# Altium PCB PiggySat-board.PcbDoc
Units mil, origin at the board's own origin, x right, y up, seen from the top; angles counter-clockwise.
Board outline 1968.5 x 1968.5 mil, 4 copper layers (Top Layer, Mid Layer 1, Mid Layer 2, Bottom Layer), stack 62.45 mil thick; 45 components, 33 nets, 206 pads, 454 vias.
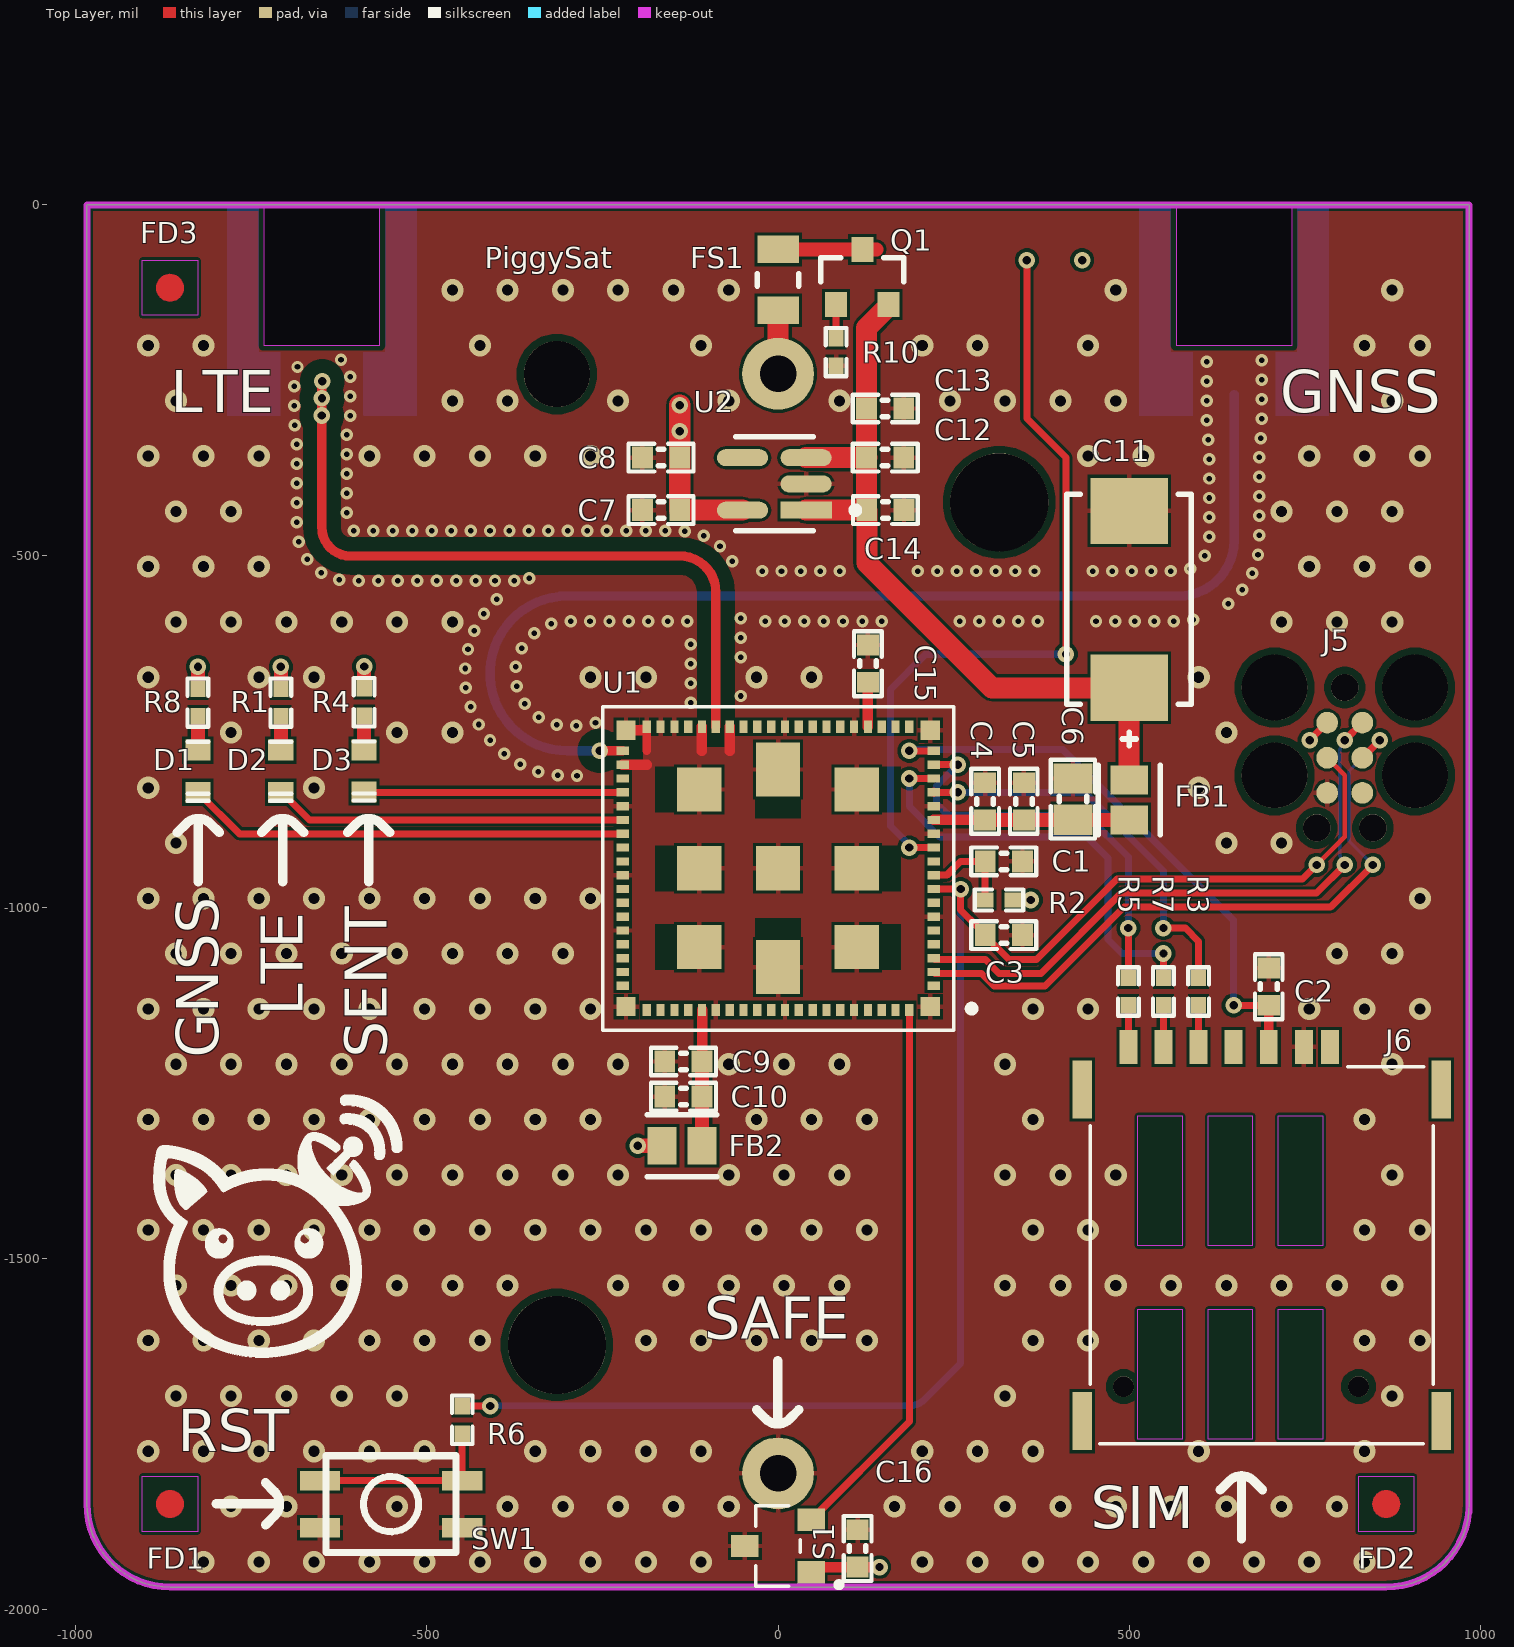
[diagram p0: Top Layer view]
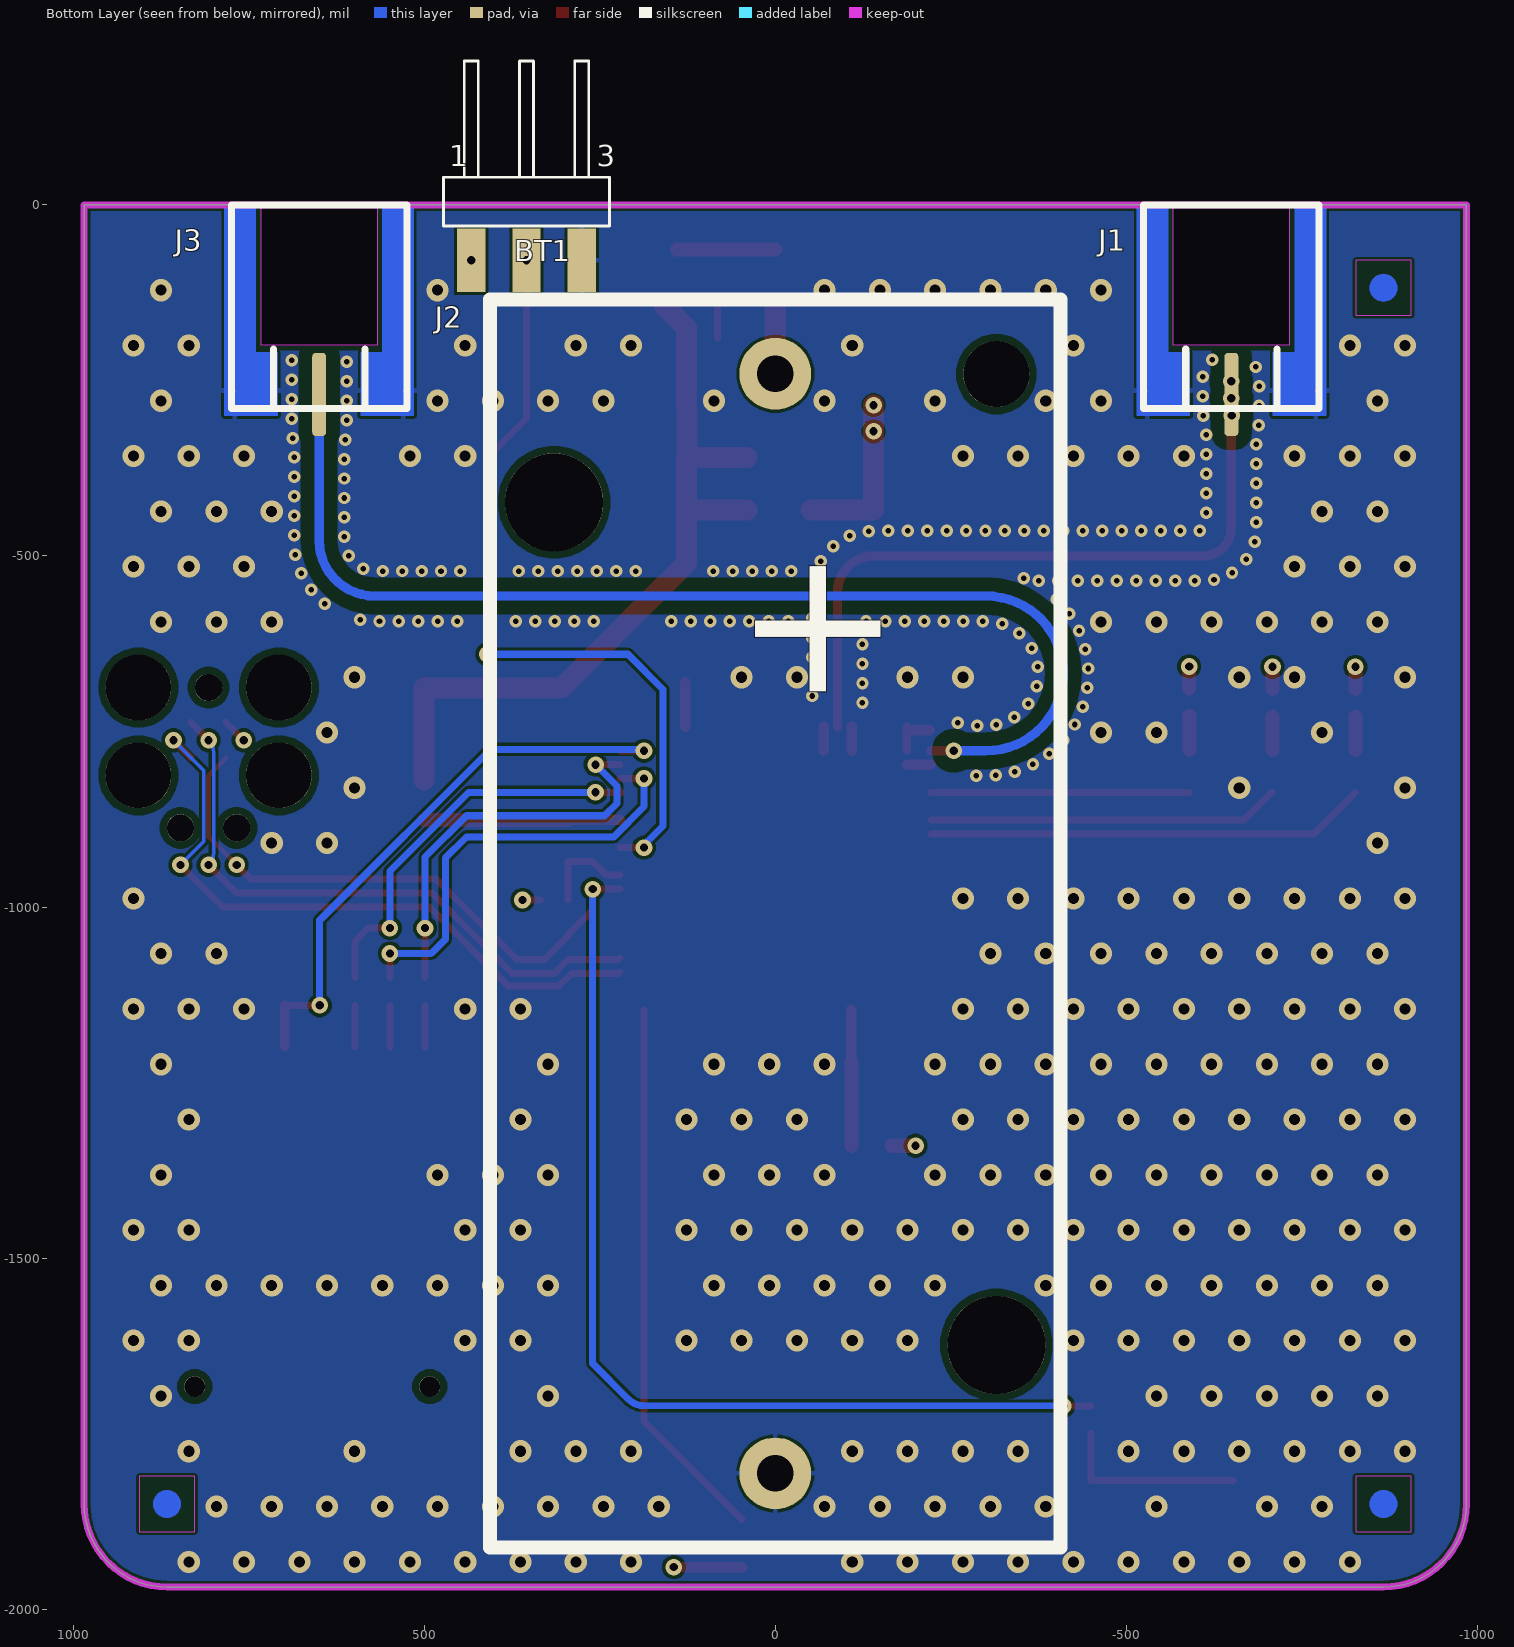
[diagram p1: Bottom Layer view, seen from below]
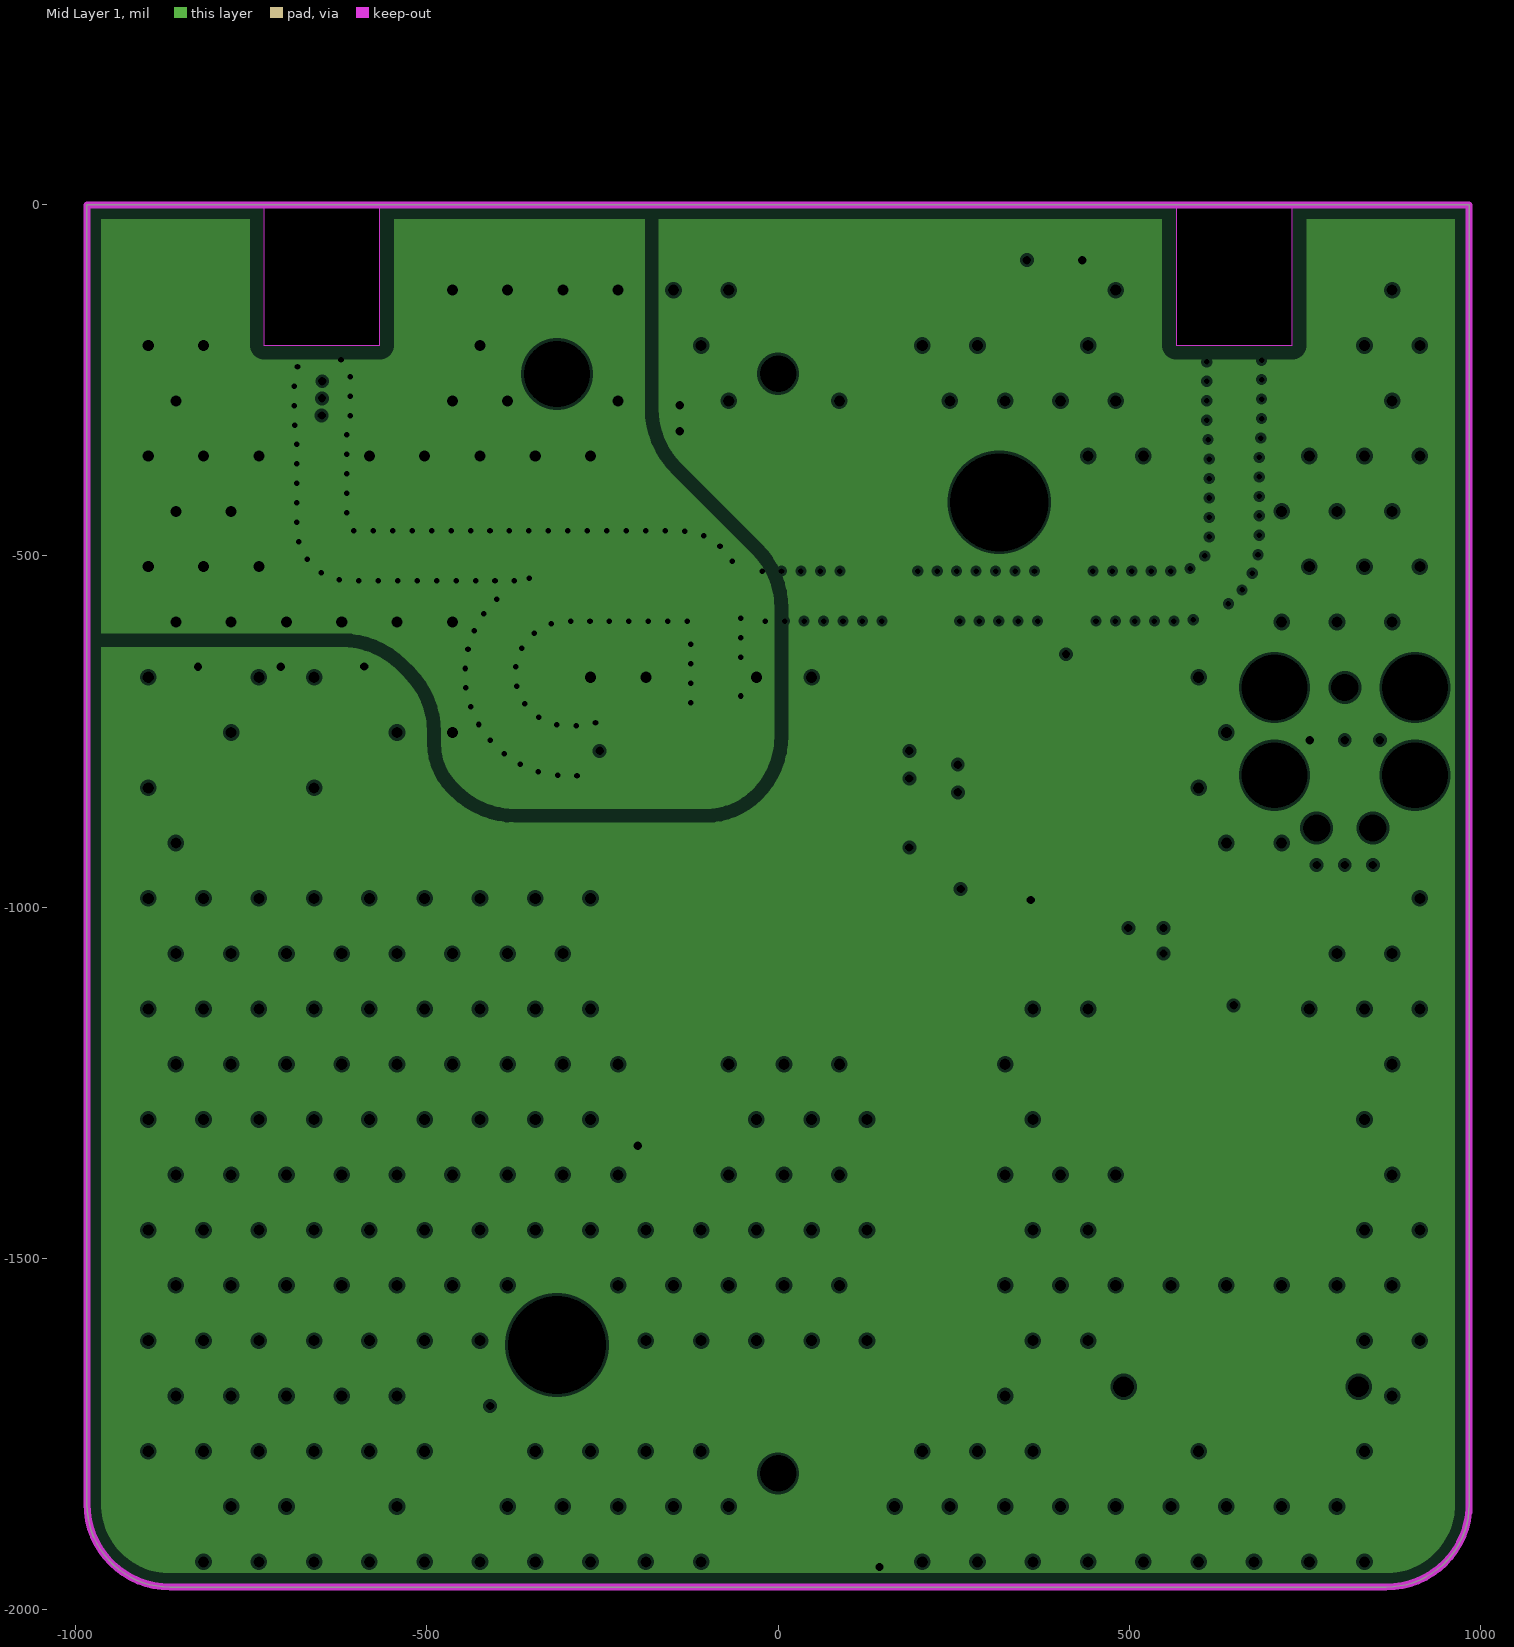
[diagram p2: Mid Layer 1, clearances drawn from the general rule]
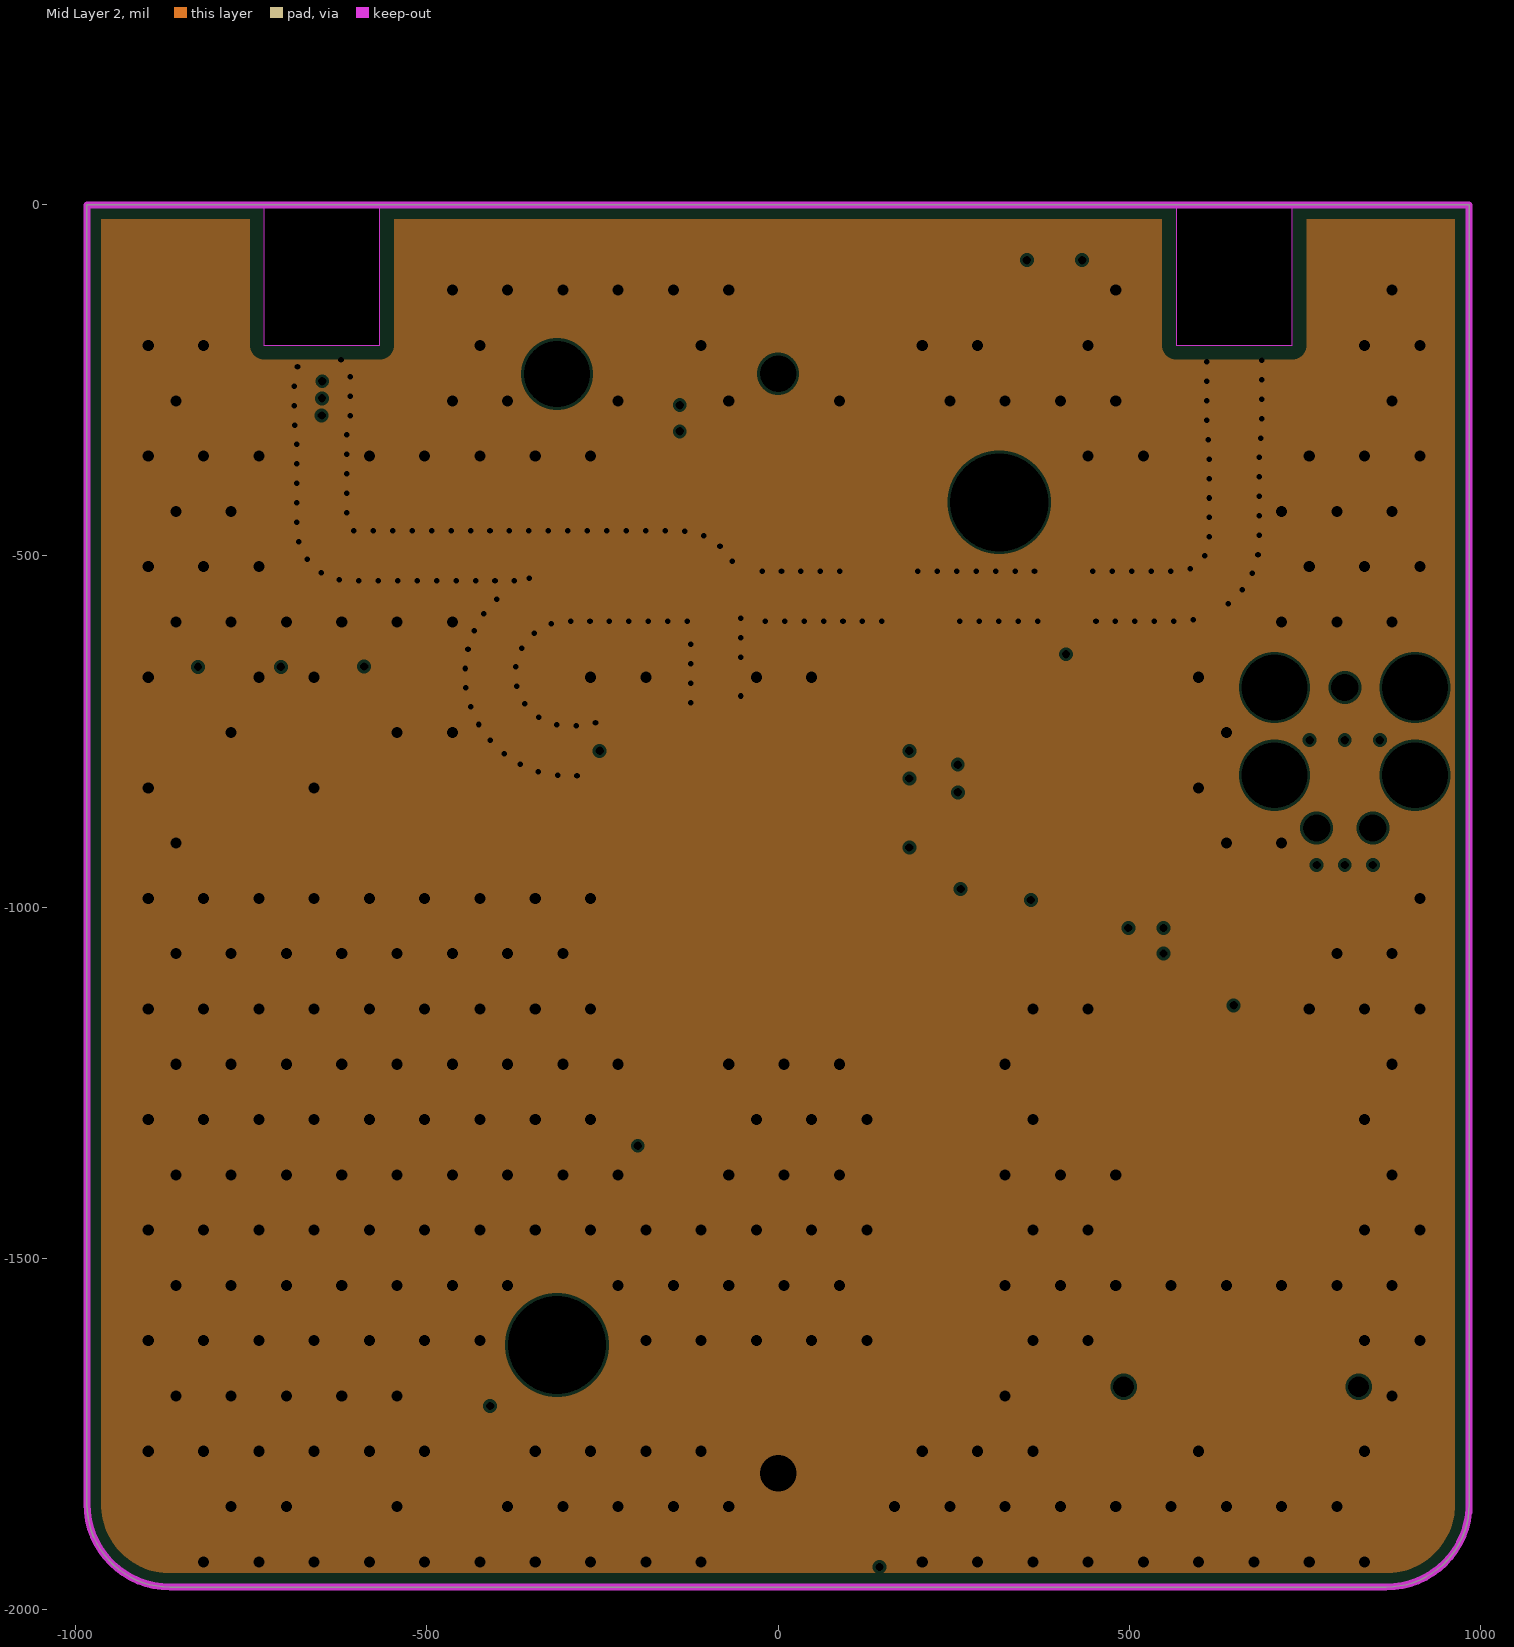
[diagram p3: Mid Layer 2, clearances drawn from the general rule]
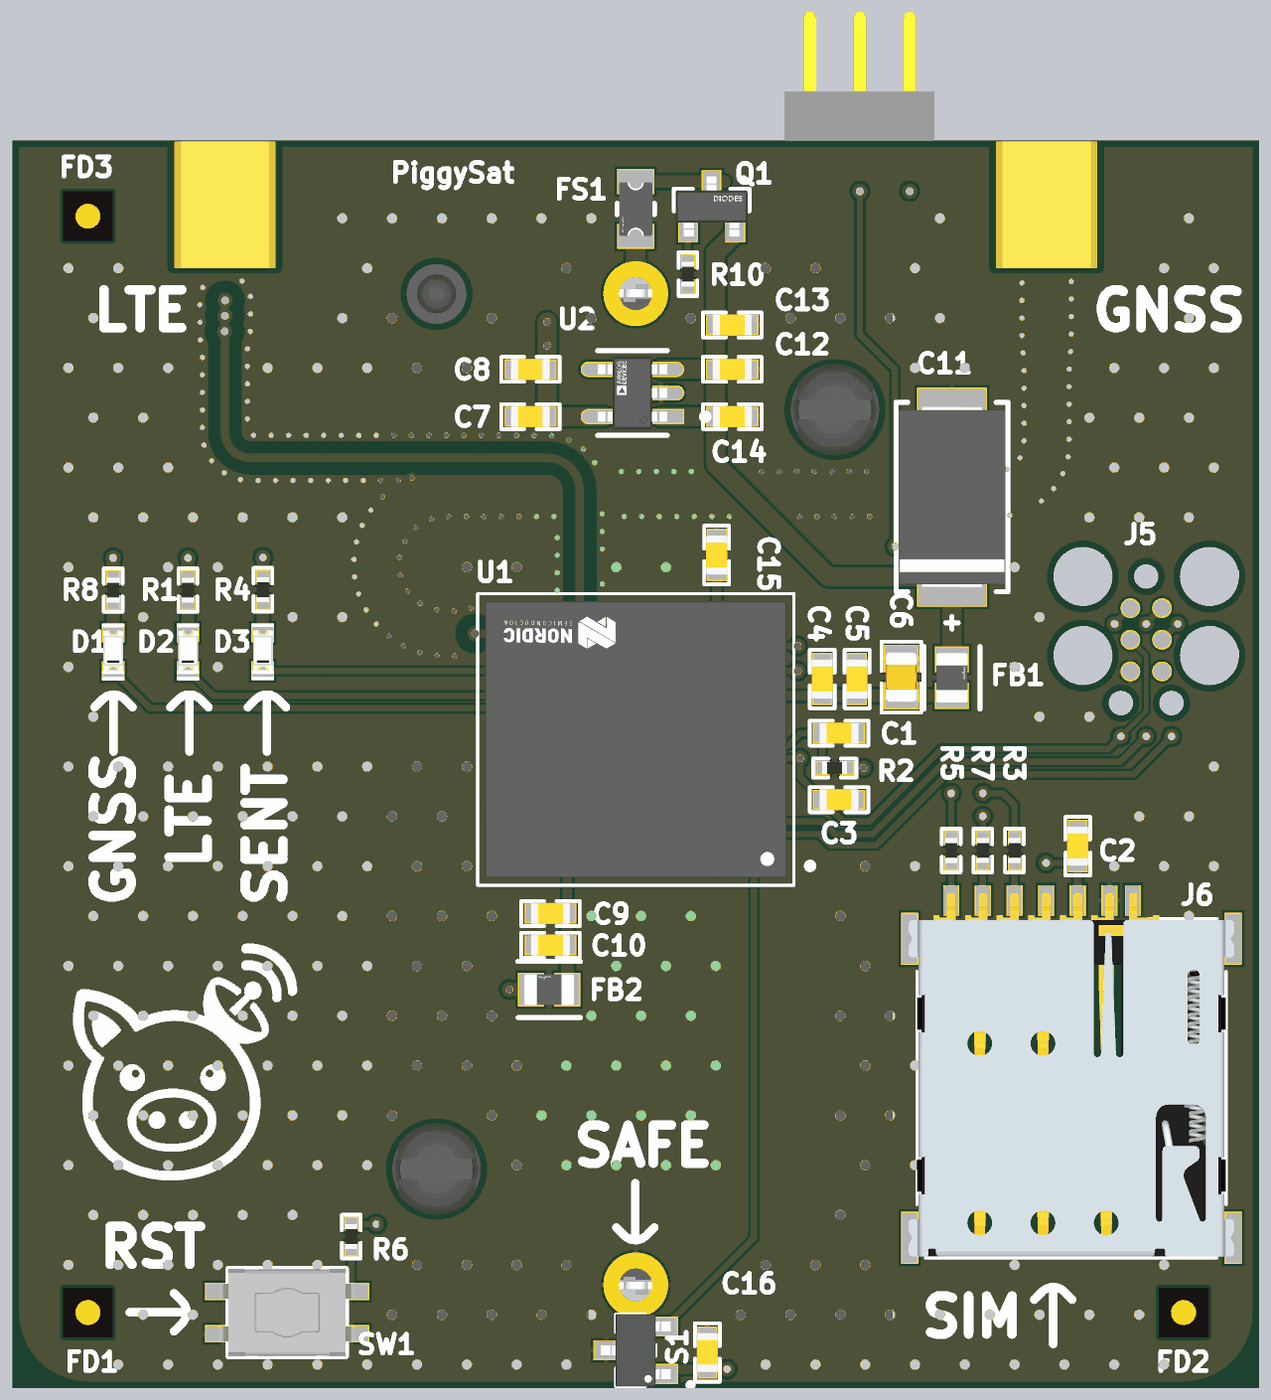
[diagram p4: 3D render of the assembled board from above, using the file's embedded part models]
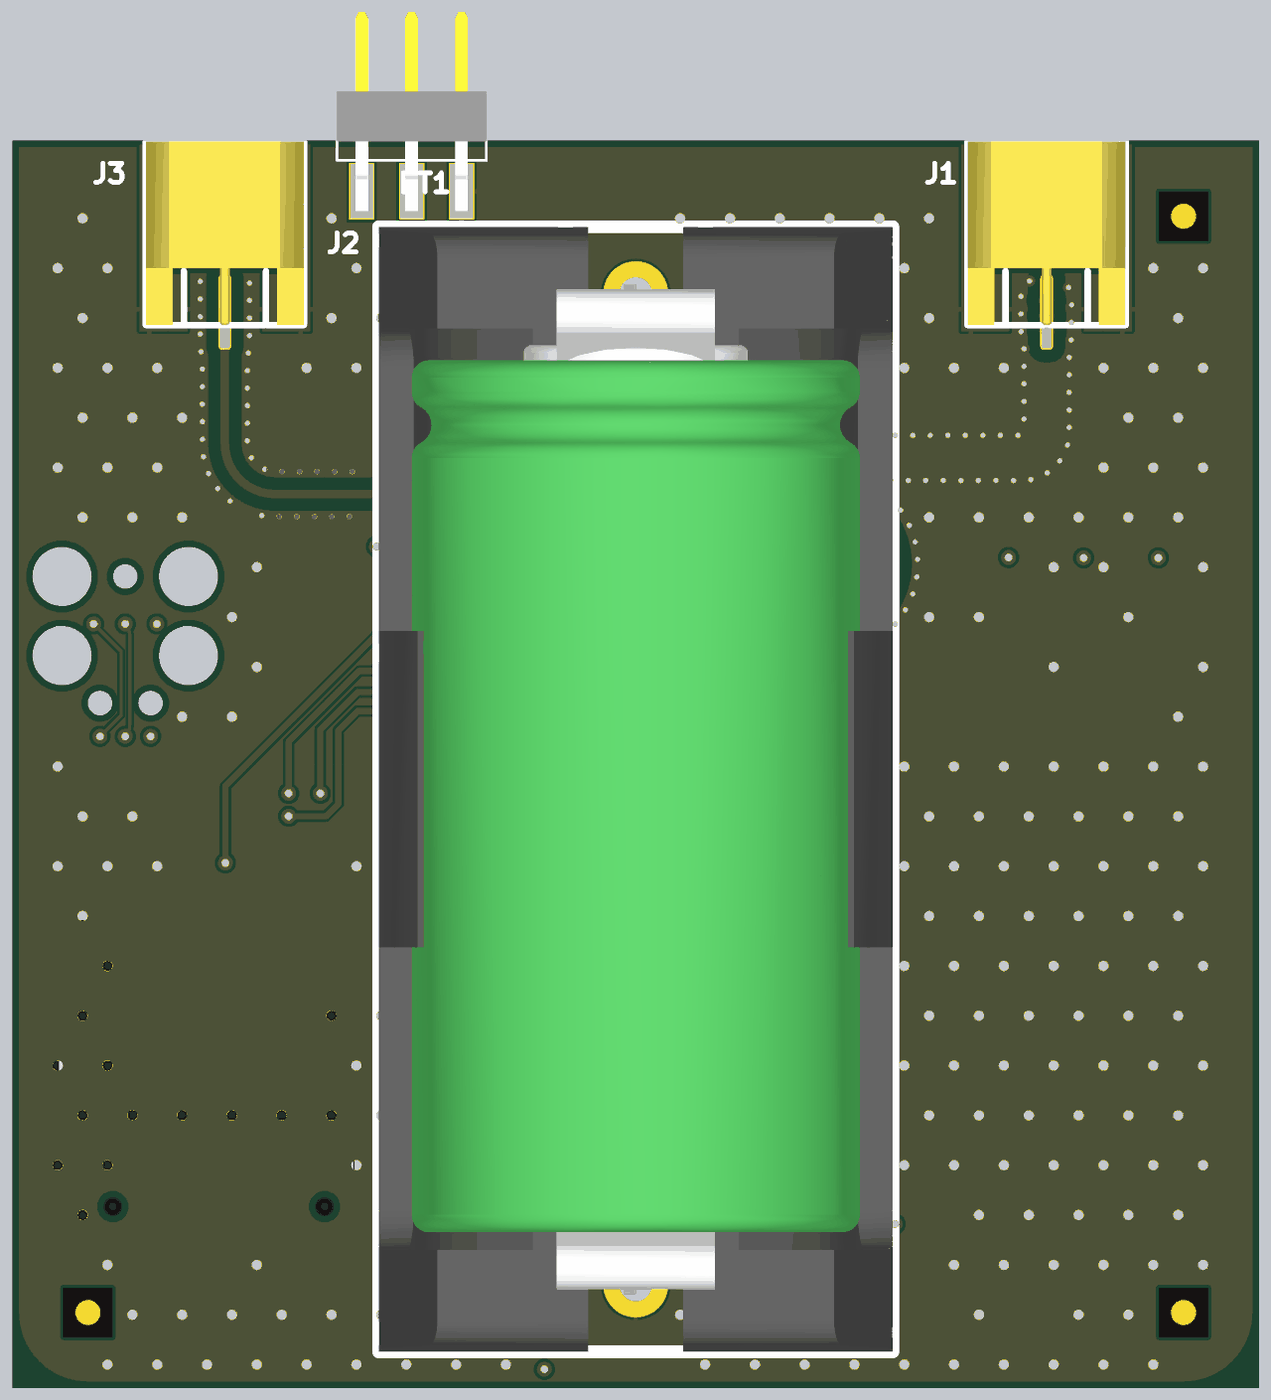
[diagram p5: 3D render of the assembled board from below, using the file's embedded part models]

## Layer stack, top to bottom
Top Solder: solder mask 0.5, Solder Resist, Dk 3.8
Top Layer: signal copper 1.3799
Dielectric 1: prepreg 8.2799, 7628, Dk 4.4
Mid Layer 1: plane copper 0.6, net (Multiple Nets)
Core: core 41.9299, FR-4, Dk 4.6
Mid Layer 2: plane copper 0.6, net GND
Dielectric 2: prepreg 8.2799, 7628, Dk 4.4
Bottom Layer: signal copper 1.3799
Bottom Solder: solder mask 0.5, Solder Resist, Dk 3.8

## Board outline
-866.14,-1968.5 cw(c-866.14,-1850.39) -984.25,-1850.39 -984.25,0 984.25,0 984.25,-1850.39 cw(c866.14,-1850.39) 866.14,-1968.5

## Design rules (kind name [scope] priority, off if disabled: settings)
BoardOutlineClearance [All] p1: gap=7.87 ignorepadtopadclearanceinfootprint=FALSE
Clearance Clearance_RF [InPoly vs InNetClass('RF')] p1: gap=19.68 ignorepadtopadclearanceinfootprint=FALSE
Clearance [All] p2: gap=4 ignorepadtopadclearanceinfootprint=FALSE except(5: Arc-Via Track-Via SMDPad-Via THPad-Via Via-Via Via-Fill Via-Poly Via-Region Via-Text; 9.84: Arc-Hole Track-Hole SMDPad-Hole THPad-Hole Via-Hole Fill-Hole Poly-Hole Region-Hole Text-Hole)
ComponentClearance [All] p1: gap=4 collisioncheckmode=3 verticalgap=4 showdistances=TRUE
DiffPairsRouting [All] p1: maxlimit=4 minlimit=4 mostfreqgap=4 toplayer_minwidth=4 toplayer_maxwidth=71497.94 toplayer_prefwidth=4 bottomlayer_minwidth=4 bottomlayer_maxwidth=71497.94 bottomlayer_prefwidth=4 maxuncoupledlength=500
Height [All] p1: minheight=0 maxheight=71497.94 prefheight=500
HoleSize [All] p1: absolutevalues=TRUE maxlimit=248.03 minlimit=7.87 maxpercent=80.000 minpercent=20.000
HoleToHoleClearance [All] p1: gap=9.84 allowstackedmicrovias=FALSE
MinimumAnnularRing [All] p1: minimumring=3
MinimumSolderMaskSliver [All] p1: minsoldermaskwidth=0
PasteMaskExpansion [All] p1: expansion=-2
PlaneClearance [All] p1: clearance=4
PlaneConnect [All] p1: pad.planeconnectstyle=Relief pad.reliefexpansion=11.81 pad.reliefentries=4 pad.reliefconductorwidth=7 pad.reliefairgap=4 via.planeconnectstyle=Direct via.reliefexpansion=11.81 via.reliefentries=4 via.reliefconductorwidth=5 via.reliefairgap=5
PolygonConnect [All] p1: thpad.connectstyle=Relief thpad.reliefconductorwidth=7 thpad.reliefentries=4 thpad.polygonreliefangle="90 Angle" thpad.airgapwidth=4 smdpad.connectstyle=Relief smdpad.reliefconductorwidth=7 smdpad.reliefentries=4 smdpad.polygonreliefangle="90 Angle" smdpad.airgapwidth=4 via.connectstyle=Direct via.reliefconductorwidth=7 via.reliefentries=4 via.polygonreliefangle="90 Angle" via.airgapwidth=4
RoutingVias [All] p1: holewidth=7.87 width=17.72 viastyle="Through Hole" minholewidth=7.87 minwidth=17.72 maxholewidth=248.03 maxwidth=257.87
SilkToSilkClearance [All] p1: silktosilkclearance=0
SilkToSolderMaskClearance [IsPad] p1: minsilkscreentomaskgap=4 clearancetoexposedcopper=TRUE
SolderMaskExpansion SolderMaskExpansion_VIA [IsVia] p1: expansion=0 istentingtop=TRUE
SolderMaskExpansion [All] p2: expansion=0 istentingtop=FALSE
SupplyNets "Schematic Supply Nets_3" [InNet('Vbat')] p1: voltage=0.000
SupplyNets "Schematic Supply Nets_1" [InNet('3Vcc')] p2: voltage=0.000
SupplyNets "Schematic Supply Nets" [InNet('GND')] p3: voltage=0.000
Width Width_RF [InNetClass('RF')] p1: maxlimit=13.78 minlimit=12.99 preferedwidth=13.41 impedanceprofiledriven=TRUE impedanceprofileid={B5F699CF-0F15-4DB4-B4B9-B7FA848858C8} impedanceprofilevalue=50.000000 minimp=50.000000 maximp=50.000000 favimp=50.000000
Width [All] p2: maxlimit=71497.94 minlimit=4 preferedwidth=4
19 further rules are at their usual default settings.

## Classes and differential pairs
component class PiggySat-radio: C1 C2 C3 C16 D1 D2 D3 J1 J2 J3 J5 J6 R1 R2 R3 R4 R5 R6 R7 R8 S1 SW1 U1
component class PiggySat-power: BT1 C4 C5 C6 C7 C8 C9 C10 C11 C12 C13 C14 C15 FB1 FB2 FD1 FD2 FD3 FS1 Q1 R10 U2
net class RF: GNSS LTE

## Components (designator, comment, footprint, x,y, rotation, side; value= is the part's Value field where it differs from the comment)
BT1 "Keystone 1095" "KEYSTONE 1095" 0,-1023.62 r90 bottom locked
C1 "100n" CAPC1608X06L 321.5,-935.04 r0 top
C2 "100n" CAPC1608X06L 698.82,-1113.43 r270 top
C3 "100n" CAPC1608X06L 321.5,-1040 r180 top
C4 "15p" CAPC1608X06L 294.92,-849.41 r270 top
C5 "100n" CAPC1608X06L 350,-849.41 r270 top
C6 "47u" CAPC2012X11L 420,-846.46 r270 top
C7 "100n" CAPC1608X06L -166.57,-434.8 r0 top
C8 "10u" CAPC1608X06L -166.57,-360 r0 top
C9 "100n" CAPC1608X06L -134.84,-1220 r0 top
C10 "4u7" CAPC1608X06L -134.84,-1270 r0 top
C11 "ECASD40J107M015K00" FP-ECAS-D4-MFG 500,-561.89 r90 top
C12 "10u" CAPC1608X06L 152.56,-360 r180 top
C13 "100n" CAPC1608X06L 152.56,-290 r180 top
C14 "1u" CAPC1608X06L 152.8,-434.8 r180 top
C15 "4u7" CAPC1608X06L 127.95,-653.43 r270 top
C16 "100n" CAPC1608X06L 113.27,-1913.43 r90 top
D1 "SML-D12U8WT86C" SML-D12 -826.22,-806.61 r0 top
D2 "SML-D12D8WT86C" SML-D12 -708.11,-806.61 r0 top
D3 "SML-D12P8WT86C" SML-D12 -589.72,-806.34 r0 top
FB1 "BLM21PG121SN1D" FP-BLM21-0_2-t0_85-e0_5-d-IPC_C 500,-847.42 r90 top
FB2 "BLM21PG121SN1D" FP-BLM21-0_2-t0_85-e0_5-d-IPC_C -136.84,-1340 r180 top
FD1 "Fiducial_1mm" Fiducial_1mm-Footprint-1 -866.14,-1850.39 r0 top locked
FD2 "Fiducial_1mm" Fiducial_1mm-Footprint-1 866.14,-1850.39 r90 top locked
FD3 "Fiducial_1mm" Fiducial_1mm-Footprint-1 -866.14,-118.11 r90 top locked
FS1 "MF-PSMF075X-2" FP-MF-PSMF-MFG 0,-106.69 r270 top value=1-7.5Ω
J1 "73415-5740" MOLEX_734155740 -649.61,0 r270 bottom locked
J2 "73415-5740" MOLEX_734155740 649.61,0 r270 bottom locked
J3 "MMT-103-02-S-SH-P-TR" MMT-103-01-SM-SH-TR 354.33,0 r180 bottom locked
J5 "TC2030" TC2030-IDC 807.09,-787.4 r270 top
J6 "693041010711" 693041010711 688.98,-1496.06 r0 top locked
Q1 "DMP2123L-7" FP-SOT23-MFG 120,-102.76 r90 top
R1 "4k7" RESC1005X04L -708.11,-708.82 r270 top
R2 "10k" RESC1005X04L 314.61,-990 r180 top
R3 "47" RESC1005X04L 598.82,-1120.31 r270 top
R4 "470" RESC1005X04L -589.45,-708.27 r270 top
R5 "47" RESC1005X04L 548.82,-1120.31 r90 top
R6 "1k" RESC1005X04L -449.8,-1730.31 r90 top
R7 "47" RESC1005X04L 498.82,-1120.31 r270 top
R8 "4k7" RESC1005X04L -826.22,-708.82 r270 top
R10 "100R" RESC1005X04L 82.6,-209.68 r270 top
S1 "TMR1304S" SOT-23-3 0,-1910 r180 top locked
SW1 "EVQP2402W" EVQP2402W -551.18,-1850.39 r90 top locked
U1 "NRF9151-LACA-R" FP-nRF9151-LACA-R_MFG 0,-944.88 r180 top
U2 "ADP160AUJZ-3.0-R7" FP-UJ-5-IPC_A -5.29,-397.4 r180 top

## Footprints (in the part's own frame and the unit in brackets; to place one, negate y for a bottom-side part, rotate by r counter-clockwise, add the part's x,y. Pads: shape width x height; smd on the part's side, far side on the other; paste and mask are expansions set on the pad)
693041010711 [mm] "NanoSIM Push-Push CD SMT"
  rect 0.65x1.23 smd: C1(0.25,7.54) C2(-2.29,7.54) C3(-4.83,7.54) C5(1.52,7.54) C6(-1.02,7.54) C7(-3.56,7.54) CD(2.47,7.54)
  round 0.75 hole 0.75 unplated: NPTH1(-5,-4.75) NPTH2(3.5,-4.75)
  rect 0.7x2.1 smd: Shell(-6.495,-6) Shell(-6.495,6) Shell(6.495,-6) Shell(6.495,6)
  Top Layer keep-out region: 0.6,5.05 2.2,5.05 2.2,0.35 0.6,0.35
  Top Layer keep-out region: -4.48,5.05 -2.88,5.05 -2.88,0.35 -4.48,0.35
  Top Layer keep-out region: -1.94,5.05 -0.34,5.05 -0.34,0.35 -1.94,0.35
  Top Layer keep-out region: 0.6,-1.95 2.2,-1.95 2.2,-6.65 0.6,-6.65
  Top Layer keep-out region: -4.48,-1.95 -2.88,-1.95 -2.88,-6.65 -4.48,-6.65
  Top Layer keep-out region: -1.94,-1.95 -0.34,-1.95 -0.34,-6.65 -1.94,-6.65
  silkscreen extent -6.21,-6.81 6.21,6.81, body extent -6.55,-6.75 6.55,7.85, height 1.47
CAPC1608X06L [mm]
  rect 0.75x0.8 smd: 1(-0.675,0) 2(0.675,0)
  silkscreen extent -1.17,-0.5 1.17,0.5, body extent -0.8,-0.43 0.8,0.43, height 0.8
CAPC2012X11L [mm]
  rect 1.1x1.4 smd: 1(-0.75,0) 2(0.75,0)
  silkscreen extent -1.43,-0.8 1.42,0.8, body extent -1,-0.62 1,0.63, height 0.77
EVQP2402W [mm] "Light Touch Switches/EVQP2/P9/3P2"
  rect 0.7x1.45 smd: 1(-0.85,2.575) 2(0.85,2.575) 3(-0.85,-2.575) 4(0.85,-2.575)
  silkscreen extent -1.75,-2.35 1.75,2.35, body extent -1.75,-2.75 1.75,2.75, height 2.5
Fiducial_1mm-Footprint-1 [mil]
  Top Layer region: 0,-19.68 -7.53,-18.19 -13.92,-13.92 -18.19,-7.53 -19.68,0 -19.68,0 -18.19,7.53 -13.92,13.92 -7.53,18.19 0,19.68 0,19.68 7.53,18.19 13.92,13.92 18.19,7.53 19.68,0 19.68,0 18.19,-7.53 13.92,-13.92 7.53,-18.19 0,-19.68
  Top Layer keep-out region: -39.37,-39.37 -39.37,39.37 39.37,39.37 39.37,-39.37
  Bottom Layer region: 0,-19.68 -7.53,-18.19 -13.92,-13.92 -18.19,-7.53 -19.68,0 -19.68,0 -18.19,7.53 -13.92,13.92 -7.53,18.19 0,19.68 0,19.68 7.53,18.19 13.92,13.92 18.19,7.53 19.68,0 19.68,0 18.19,-7.53 13.92,-13.92 7.53,-18.19 0,-19.68
  Bottom Layer keep-out region: -39.37,-39.37 -39.37,39.37 39.37,39.37 39.37,-39.37
FP-BLM21-0_2-t0_85-e0_5-d-IPC_C [mil]
  rect 41.53x53.39 smd: 1(-28.57,0) 2(28.57,0)
  silkscreen extent -49,-44 49,44, body extent -53,-32 53,32, height 10
FP-ECAS-D4-MFG [mm]
  rect 2.4x2.8 smd: 1(3.2,0) 2(-3.2,0)
  silkscreen extent -5.3,-2.25 3.8,2.25, body extent -4.5,-2.35 4.5,2.35, height 0.25
FP-MF-PSMF-MFG [mm]
  rect 1x1.5 smd: 1(-1.1,0) 2(1.1,0)
  silkscreen extent -0.23,-0.75 0.23,0.75, body extent -1.7,-0.85 1.7,0.85, height 0.25
FP-nRF9151-LACA-R_MFG [mm]
  rect 0.7x0.7 smd paste-2539.97: 1(-5.5,5) 20(-5.5,-5) 41(5.5,-5) 60(5.5,5)
  rect 0.45x0.3 smd paste-2539.97: 2(-5.625,4.25) 3(-5.625,3.75) 4(-5.625,3.25) 5(-5.625,2.75) 6(-5.625,2.25) 7(-5.625,1.75) 8(-5.625,1.25) 9(-5.625,0.75) 10(-5.625,0.25) 11(-5.625,-0.25) 12(-5.625,-0.75) 13(-5.625,-1.25) 14(-5.625,-1.75) 15(-5.625,-2.25) 16(-5.625,-2.75) 17(-5.625,-3.25) 18(-5.625,-3.75) 19(-5.625,-4.25) 42(5.625,-4.25) 43(5.625,-3.75) 44(5.625,-3.25) 45(5.625,-2.75) 46(5.625,-2.25) 47(5.625,-1.75) 48(5.625,-1.25) 49(5.625,-0.75) 50(5.625,-0.25) 51(5.625,0.25) 52(5.625,0.75) 53(5.625,1.25) 54(5.625,1.75) 55(5.625,2.25) 56(5.625,2.75) 57(5.625,3.25) 58(5.625,3.75) 59(5.625,4.25)
  rect 0.3x0.45 smd paste-2539.97: 21(-4.75,-5.125) 22(-4.25,-5.125) 23(-3.75,-5.125) 24(-3.25,-5.125) 25(-2.75,-5.125) 26(-2.25,-5.125) 27(-1.75,-5.125) 28(-1.25,-5.125) 29(-0.75,-5.125) 30(-0.25,-5.125) 31(0.25,-5.125) 32(0.75,-5.125) 33(1.25,-5.125) 34(1.75,-5.125) 35(2.25,-5.125) 36(2.75,-5.125) 37(3.25,-5.125) 38(3.75,-5.125) 39(4.25,-5.125) 40(4.75,-5.125) 61(4.75,5.125) 62(4.25,5.125) 63(3.75,5.125) 64(3.25,5.125) 65(2.75,5.125) 66(2.25,5.125) 67(1.75,5.125) 68(1.25,5.125) 69(0.75,5.125) 70(0.25,5.125) 71(-0.25,5.125) 72(-0.75,5.125) 73(-1.25,5.125) 74(-1.75,5.125) 75(-2.25,5.125) 76(-2.75,5.125) 77(-3.25,5.125) 78(-3.75,5.125) 79(-4.25,5.125) 80(-4.75,5.125)
  rect 1.6x1.6 smd paste-2539.97: 105(-2.85,2.85) 106(-2.85,0) 107(-2.85,-2.85) 109(2.85,-2.85) 110(2.85,0) 111(2.85,2.85) 113(0,0)
  rect 1.6x1.95 smd paste-2539.97: 108(0,-3.575) 112(0,3.575)
  Top Layer pour cut-out: -4.445,3.675 -3.675,3.675 -3.675,2.025 -4.445,2.025
  Top Layer pour cut-out: -0.825,1.805 -0.825,2.575 0.825,2.575 0.825,1.805
  Top Layer pour cut-out: -4.445,0.825 -3.675,0.825 -3.675,-0.825 -4.445,-0.825
  Top Layer pour cut-out: -4.445,-2.025 -3.675,-2.025 -3.675,-3.675 -4.445,-3.675
  Top Layer pour cut-out: 0.825,-1.805 0.825,-2.575 -0.825,-2.575 -0.825,-1.805
  Top Layer pour cut-out: 4.445,-0.825 3.675,-0.825 3.675,0.825 4.445,0.825
  Top Layer pour cut-out: 4.445,-3.675 3.675,-3.675 3.675,-2.025 4.445,-2.025
  Top Layer pour cut-out: 4.445,2.025 3.675,2.025 3.675,3.675 4.445,3.675
  silkscreen extent -7.13,-5.85 6.35,5.85, body extent -6.05,-5.55 6.05,5.55, height 1.3
FP-SOT23-MFG [mm]
  rect 0.9x0.8 smd: 1(-1,0.95) 2(-1,-0.95) 3(1,0)
  silkscreen extent -0.18,-1.5 0.7,1.5, body extent -1.55,-1.6 1.55,1.6, height 0.25
FP-UJ-5-IPC_A [mm]
  rect 1.854x0.612 smd: 1(-1.15,0.95)
  rrect100% 1.854x0.612 smd: 2(-1.15,0) 3(-1.15,-0.95) 4(1.15,-0.95) 5(1.15,0.95)
  silkscreen extent -3.05,-1.7 1.4,1.7, body extent -2.58,-1.95 2.58,1.95, height 0.25
"KEYSTONE 1095" [mm] "THM Holder for 18350 Battery P/N 1095"
  round 2.6 hole 1.32: N(-19.89,0) P(19.89,0)
  round 3.55 hole 3.55 unplated: ""(-15.24,-8) ""(15.24,8)
  round 2.39 hole 2.39 unplated: ""(19.88,-8)
  silkscreen extent -22.57,-10.33 22.57,10.33, body extent -22.58,-10.33 22.58,10.33, height 17.48
MMT-103-01-SM-SH-TR [mm] "MMT Series 2.00 mm Horizontal Surface Mount Terminal Strip"
  rect 1.02x2.29 smd: 1(-2,-2) 2(0,-2) 3(2,-2)
  silkscreen extent -3,-0.76 3,5.21, body extent -3,-2.79 3,5.2, height 1.95
MOLEX_734155740 [mil] "SMP PLUG, PCB EDGE MNT, SMOOTH B"
  rrect50% 118.11x19.68 smd: 1(270,0)
  round 1 smd: 2(265,-120) 2(265,120)
  Keep-Out Layer board cut-out: 0,82.68 200,82.68 200,-82.68 0,-82.68
  silkscreen extent 0,-125 290,125, body extent 0,-125 290,125, height 97
RESC1005X04L [mm]
  rect 0.6x0.55 smd: 1(-0.5,0) 2(0.5,0)
  silkscreen extent -0.87,-0.38 0.88,0.38, body extent -0.5,-0.25 0.5,0.25, height 0.3
SML-D12 [mil] "LED, 0603, SMD, 0,8mm x 1,6mm, 20 mA, 2.2 V"
  rect 36x30 smd: 1(0,30) 2(0,-30)
  silkscreen extent -15,-42 15,42, body extent -16,-30 16,35, height 21
SOT-23-3 [mm]
  rect 1x0.8 smd: 1(-1.2,0.95) 2(-1.2,-0.95) 3(1.2,0)
  silkscreen extent -2.3,-1.45 0.8,1.5, body extent -1.4,-1.45 1.4,1.45, height 1.3
TC2030-IDC [mil]
  round 31 smd: 1(-50,-25) 2(-50,25) 3(0,-25) 4(0,25) 5(50,-25) 6(50,25)
  round 93.5 hole 93.5 unplated: ""(-100,100) ""(-100,-100) ""(25,100) ""(25,-100)
  round 39 hole 39 unplated: ""(-100,0) ""(100,40) ""(100,-40)

## Part data
BT1: "THM Holder for 18350 Battery P/N 1095"
C1 C2 C3 C5 C7 C9 C13 C16: library part CMP-001-00001-3, "Cap 16V 100n X7R 0603 10%", Component Class=Capacitors
C4: library part CMP-001-00001-3, "Cap 16V 15p X7R 0603 10%", Component Class=Capacitors
C6: library part CMP-001-00002-1, "Cap 16V 47u X7R 0603 10%"
C8 C12: library part CMP-001-00001-3, "Cap 16V 10u X7R 0603 10%", Component Class=Capacitors
C10 C15: library part CMP-001-00001-3, "Cap 16V 4.7u X7R 0603 10%", Component Class=Capacitors
C11: library part CMP-06031-000020-2, "Polymer Aluminum Electrolytic Capacitor 2917 100uF±20% 6.3V 15mΩ", Capacitance=100uF, Case Code (Imperial)=2917, Case Code (Metric)=7343, ESR (Equivalent Series Resistance)=15mR, Max Operating Temperature=105°C, Min Operating Temperature=-40°C, Package Quantity=1, Resistance=0.015R, Ripple Current=2A, Tolerance=20%, Voltage Rating=6.3V, Case/Package=2917, Construction=Flat, Depth=4.3mm, Height=1.9mm, Height - Seated (Max)=0.075inch, Lead Free="Lead Free", Length=7.3mm, Life (Hours)=1000Hour, Mount="Surface Mount", Packaging="Tape and Reel", Polarity=Polar, Radiation Hardening=No, RoHS Compliant=Yes, Series=ECAS, Termination=SMD/SMT, Voltage Rating (DC)=6.3V, Weight=0.023634oz, Width=0.169inch
C14: library part CMP-001-00001-3, "Cap 16V 1u X7R 0603 10%", Component Class=Capacitors
D1: library part CMP-007-000019-1, "LED, 0603, Red, SMD, 0,8mm x 1,6mm, 20 mA, 2.2 V, 620 nm", Cod. Alt.=(), Cod. Fornitore=(), Cod. Mag.=LV-SMD-0805, Comment1=LED0805, Design Item ID=SML-D12U8WT86C, Fornitore=(), Montaggio=(), Prezzo=(), Source=Altium_Library.SchLib
D2: library part CMP-007-000019-1, "LED, 0603, Orange, SMD, 0,8mm x 1,6mm, 20 mA, 2.2 V, 620 nm", Cod. Alt.=(), Cod. Fornitore=(), Cod. Mag.=LV-SMD-0805, Comment1=LED0805, Design Item ID=SML-D12D8WT86C, Fornitore=(), Montaggio=(), Prezzo=(), Source=Altium_Library.SchLib
D3: library part CMP-007-000018-1, "LED, 0603, Green, SMD, 0,8mm x 1,6mm, 20 mA, 2.2 V, 560 nm", Cod. Alt.=(), Cod. Fornitore=(), Cod. Mag.=LV-SMD-0805, Comment1=LED0805, Design Item ID=SML-D12P8WT86C, Fornitore=(), Montaggio=(), Prezzo=(), Source=Altium_Library.SchLib
FB1 FB2: library part CMP-0686-00612-3, "Chip Ferrite Bead, 0805, 120Ω @ 100MHz, 0.03Ω, 25%, 3A", Case Code (Imperial)=0805, Case Code (Metric)=2012, Current Rating=3A, DC Resistance (DCR)=30mR, Max Operating Temperature=125°C, Min Operating Temperature=-55°C, Package Quantity=1, Test Frequency=100MHz, Tolerance=25%, Case/Package=0805, DC Resistance-Max=30mR, Depth=1.25mm, Height=0.85mm, Impedance=120R, Lead Free="Lead Free", Length=2mm, Material=Steel, Max Current Rating=3A, Max DC Current=3A, Number of Circuits=1, Number of Lines=1, Number of Pins=2, Packaging="Tape and Reel", REACH SVHC="No SVHC", RoHS Compliant=Yes, Series=BLM21P, Termination=SMD/SMT, Width=1.25mm
FD1 FD2 FD3: library part CMP-00017-7, "1mm fiducial marker"
FS1: library part CMP-07400-000017-1, "PTC RESET FUSE 6V 750MA 0805", Ambient Temperature Range High=+85°C, Ambient Temperature Range Low=-40°C, Current Rating=40A, Hold Current=0.1A, Manufacturer="Bourns Inc.", Manufacturer Part Number=MF-PSMF010X-2, Package=MF-PSMF, Resistance=1-7.5Ω, Temperature="-40°C to +85°C", Trip Current=0.3A, Voltage Rating=15V, Automotive=No, Category=Fuse, ComponentLink2Description=Datasheet, ComponentLink2URL=https://www.bourns.com/docs/Product-Datasheets/mfpsmf.pdf, Device Class L1="Circuit Protection", Device Class L2="PTC Resettable Fuses", Device Class L3=unset, Digikey Description="PTC RESET FUSE 15V 100MA 0805", Height=0.85mm, Ipc Land Pattern Name=CAPC215135X67, Lead Free=Yes, Mouser Description="Resettable Fuses - PPTC 0.10A 15V 1ohm", Octopart=https://octopart.com/mf-psmf010x-2-bourns-7483441, RoHS=TRUE, Temperature Range High=+85°C, Temperature Range Low=-40°C, Trip Time=1.5s
J1 J2: "SMP PLUG, PCB EDGE MNT, SMOOTH B", Manufacturer=MOLEX, ComponentLink1Description="Manufacturer URL", ComponentLink1URL=http://www.rosenberger.de, ComponentLink2Description=Datasheet, ComponentLink2URL=http://rosenberger.de/ok/images/documents/db/32K145-400L5.pdf, ComponentLink3Description="Package Specification", ComponentLink3URL=http://rosenberger.de/ok/images/documents/db/32K145-400L5.pdf, ComponentLink4Description="Series Overview / Design Note", ComponentLink4URL=http://rosenberger.de/ok/images/documents/spez/32.pdf, ComponentLink5Description="Webshop / RFQ", ComponentLink5URL=http://www.rosenberger.com/en/contact/sales/, Mounting Technology="Surface Mount", System=Connector
J3: library part MMT-103-01-SM-SH-TR, "MMT Series 2.00 mm Horizontal Surface Mount Terminal Strip", System=Connector
J5: library part CMP-002-000000-4, "Serial cable 6-pin “Legged” Tag-Connector."
J6: library part CMP-03913-167535528-1, "WR-CRD SIM Card Connectors"
Q1: library part CMP-00461-12441635-1, "DMP2123L-7 P-Channel 20 V 72 mO Surface Mount Enhancement Mode Mosfet - SOT-23", Case/Package=SOT-23-3, Continuous Drain Current (ID)=-3A, Drain to Source Breakdown Voltage=-20V, Drain to Source Resistance=51mΩ, Gate to Source Voltage (Vgs)=12V, Input Capacitance=443pF, Max Junction Temperature (Tj)=150°C, Max Power Dissipation=1.4W, Min Operating Temperature=-55°C, Resistance=72mΩ, Drain to Source Voltage (Vdss)=-20V, Element Configuration=Single, Fall Time=41ns, Height=1.1mm, Lead Free="Lead Free", Length=2.9mm, Max Operating Temperature=150°C, Mount="Surface Mount", NexarPartId=12441635, Number of Channels=1, Number of Elements=1, Number of Pins=3, Power Dissipation=1.4W, Radiation Hardening=No, Rds On Max=72mΩ, REACH SVHC="No SVHC", Rise Time=20ns, RoHS=Compliant, Schedule B="8541290080, 8541290080", Turn-Off Delay Time=38ns, Turn-On Delay Time=12ns, Weight=7.994566mg, Width=1.3mm
R1 R8: library part CMP-009-00001-2, "Res 4.7k 0402"
R2: library part CMP-009-00001-2, "Res 10k 0402"
R3 R5 R7: library part CMP-009-00001-2, "Res 47 0402"
R4: library part CMP-009-00001-2, "Res 470 0402"
R6: library part CMP-009-00001-2, "Res 1k 0402"
R10: library part CMP-009-00001-2, "Res 100R 0402"
S1: library part CMP-00000-2, "TMR130x is an omnipolar magnetic switch integrated the tunnel magnetoresistance (TMR) magnetic sensor and CMOS circuitry"
SW1: library part CMP-017-000001-1, "Light Touch Switches/EVQP2/P9/3P2", Design Item ID=EVQP2402W, Source=Altium_Library.SchLib
U1: library part CMP-00045-6, "Lower Power SIP for cellular IoT and DECT NR+, Compatible with nRF Cloud Services", Ambient Temperature Range High=85°C, Clock Frequency=2.2GHz, Max Supply Voltage=5.5V, Min Operating Temperature=-40°C, Min Supply Voltage=1.7V, Bandwidth=1.5GHz, Data Rate=3.4Mbps, Height=1.3mm, Interface="2-Wire, I2C, I2S, SPI, UART, USB", Max Operating Temperature=85°C, Number of ADC Channels=8, Number of GPIO=32, RoHS=Compliant
U2: library part CMP-09138-000096-1, "IC REG LINEAR 3V 150MA TSOT5", Case/Package=TSOT, Dropout Voltage=120mV, Max Input Voltage=5.5V, Max Operating Temperature=125°C, Max Output Current=150mA, Max Output Voltage=4.2V, Max Supply Current=42uA, Min Current Limit=220mA, Min Input Voltage=2.2V, Min Operating Temperature=-40°C, Min Output Voltage=1.2V, Output Voltage=3V, Output Voltage Accuracy=2%, Power Supply Rejection Ratio (PSRR)=60dB, Quiescent Current=0mA, Accuracy=2%, Contact Plating=Tin, Height=0.9mm, Lead Free="Contains Lead", Length=2.9mm, Mount="Surface Mount", Nominal Supply Current=42uA, Number of Outputs=1, Number of Pins=5, Number of Regulators=1, Operating Supply Current=42uA, Output Current=150mA, Output Type=Fixed, Packaging="Tape and Reel", Polarity=Positive, RoHS Compliant=Yes, Series=-, Width=1.6mm

## Via types
v1: diameter 31.5, hole 15.75, Top Layer to Bottom Layer, tented both sides, 269 vias
v2: diameter 17.72, hole 7.87, Top Layer to Bottom Layer, tented both sides, 153 vias
v3: diameter 23.62, hole 11.81, Top Layer to Bottom Layer, tented both sides, 32 vias

## Nets (pads, with @x,y where several pads share a name; then routed paths per layer and width w, separated by ;. In a path a pad name is that pad's centre, name@x,y a point inside that pad or via, vN(x,y) a via of type N, cw(c..) or ccw(c..) an arc to the next point about the centre after c; other vN are vias at no path point)
3Vcc: C7.2 C8.2 C16.1 FB2.2 J3.1 J5.1 R1.1 R2.1 R4.1 R8.1 S1.1 U2.5 | length 525.3
  Top Layer w10: R2.1 v3(360,-990) ; v3(757.09,-762.4) J5.1
  Top Layer w15: S1.1@47.24,-1940 C16.1 v3(144.45,-1940)
  Top Layer w20: R8.1 v3(-826.22,-657.95) ; R1.1 v3(-708.11,-657.95) ; R4.1 v3(-589.45,-657.4) ; v3(-199.85,-1340) FB2.2
  Top Layer w30: v3(-140,-285.2) v3(-140,-322.6) C8.2 C7.2 U2.5
  other v3: 433.07,-78.74
GND: BT1.N C1.2 C2.1 C3.1 C4.1 C5.1 C6.1 C7.1 C8.1 C9.1 C10.1 C11.1 C12.1 C13.1 C14.1 C15.1 C16.2 J1.2 J2.2 J3.3 J5.5 J6.C5 R10.2 S1.3 SW1.1 SW1.3 U1.1 U1.7 U1.13 U1.15 U1.20 U1.25 U1.30 U1.34 U1.36 U1.38 U1.39 U1.40 U1.41 U1.43 U1.46 U1.51 U1.55 U1.60 U1.66 U1.71 U1.76 U1.105 U1.106 U1.107 U1.108 U1.109 U1.110 U1.111 U1.112 U1.113 U2.2 | length 169
  Top Layer w10: U1.43 U1.43@-220.55,-796.34 ; U1.36@-108.7,-743.11 U1.36
  Top Layer w12: -187.01,-777.56 U1.40
  Top Layer w15: U1.43 -187.01,-797.24 ; U1.41@-220.04,-748.03 U1.41 U1.40@-190.51,-748.03 ; -108.7,-777.56 U1.36@-108.7,-743.11 ; -68.9,-777.56 U1.34
  other v1: -818.27,-1932.56 -739.53,-1932.56 -660.79,-1932.56 -582.05,-1932.56 -503.31,-1932.56 -424.57,-1932.56 -345.83,-1932.56 -267.09,-1932.56 -188.34,-1932.56 -109.6,-1932.56 205.36,-1932.56 284.1,-1932.56 362.84,-1932.56 441.58,-1932.56 520.32,-1932.56 599.06,-1932.56 677.8,-1932.56 756.54,-1932.56 835.28,-1932.56 -778.9,-1853.82 -700.16,-1853.82 -542.68,-1853.82 -385.2,-1853.82 -306.46,-1853.82 -227.72,-1853.82 -148.97,-1853.82 -70.23,-1853.82 165.99,-1853.82 244.73,-1853.82 323.47,-1853.82 402.21,-1853.82 480.95,-1853.82 559.69,-1853.82 638.43,-1853.82 717.17,-1853.82 795.91,-1853.82 -897.01,-1775.08 -818.27,-1775.08 -739.53,-1775.08 -660.79,-1775.08 -582.05,-1775.08 -503.31,-1775.08 -345.83,-1775.08 -267.09,-1775.08 -188.34,-1775.08 -109.6,-1775.08 205.36,-1775.08 284.1,-1775.08 362.84,-1775.08 599.06,-1775.08 835.28,-1775.08 -857.64,-1696.34 -778.9,-1696.34 -700.16,-1696.34 -621.42,-1696.34 -542.68,-1696.34 323.47,-1696.34 874.65,-1696.34 -897.01,-1617.6 -818.27,-1617.6 -739.53,-1617.6 -660.79,-1617.6 -582.05,-1617.6 -503.31,-1617.6 -424.57,-1617.6 -188.34,-1617.6 -109.6,-1617.6 -30.86,-1617.6 47.88,-1617.6 126.62,-1617.6 362.84,-1617.6 441.58,-1617.6 835.28,-1617.6 914.02,-1617.6 -857.64,-1538.86 -778.9,-1538.86 -700.16,-1538.86 -621.42,-1538.86 -542.68,-1538.86 -463.94,-1538.86 -385.2,-1538.86 -227.72,-1538.86 -148.97,-1538.86 -70.23,-1538.86 8.51,-1538.86 87.25,-1538.86 323.47,-1538.86 402.21,-1538.86 480.95,-1538.86 559.69,-1538.86 638.43,-1538.86 717.17,-1538.86 795.91,-1538.86 874.65,-1538.86 -897.01,-1460.12 -818.27,-1460.12 -739.53,-1460.12 -660.79,-1460.12 -582.05,-1460.12 -503.31,-1460.12 -424.57,-1460.12 -345.83,-1460.12 -267.09,-1460.12 -188.34,-1460.12 -109.6,-1460.12 -30.86,-1460.12 47.88,-1460.12 126.62,-1460.12 362.84,-1460.12 441.58,-1460.12 835.28,-1460.12 914.02,-1460.12 -857.64,-1381.38 -778.9,-1381.38 -700.16,-1381.38 -621.42,-1381.38 -542.68,-1381.38 -463.94,-1381.38 -385.2,-1381.38 -306.46,-1381.38 -227.72,-1381.38 -70.23,-1381.38 8.51,-1381.38 87.25,-1381.38 323.47,-1381.38 402.21,-1381.38 480.95,-1381.38 874.65,-1381.38 -897.01,-1302.64 -818.27,-1302.64 -739.53,-1302.64 -660.79,-1302.64 -582.05,-1302.64 -503.31,-1302.64 -424.57,-1302.64 -345.83,-1302.64 -267.09,-1302.64 -30.86,-1302.64 47.88,-1302.64 126.62,-1302.64 362.84,-1302.64 835.28,-1302.64 -857.64,-1223.9 -778.9,-1223.9 -700.16,-1223.9 -621.42,-1223.9 -542.68,-1223.9 -463.94,-1223.9 -385.2,-1223.9 -306.46,-1223.9 -227.72,-1223.9 -70.23,-1223.9 8.51,-1223.9 87.25,-1223.9 323.47,-1223.9 874.65,-1223.9 -897.01,-1145.16 -818.27,-1145.16 -739.53,-1145.16 -660.79,-1145.16 -582.05,-1145.16 -503.31,-1145.16 -424.57,-1145.16 -345.83,-1145.16 -267.09,-1145.16 362.84,-1145.16 441.58,-1145.16 756.54,-1145.16 835.28,-1145.16 914.02,-1145.16 -857.64,-1066.42 -778.9,-1066.42 -700.16,-1066.42 -621.42,-1066.42 -542.68,-1066.42 -463.94,-1066.42 -385.2,-1066.42 -306.46,-1066.42 795.91,-1066.42 874.65,-1066.42 -897.01,-987.68 -818.27,-987.68 -739.53,-987.68 -660.79,-987.68 -582.05,-987.68 -503.31,-987.68 -424.57,-987.68 -345.83,-987.68 -267.09,-987.68 914.02,-987.68 -857.64,-908.94 638.43,-908.94 717.17,-908.94 -897.01,-830.19 -660.79,-830.19 599.06,-830.19 -778.9,-751.45 -542.68,-751.45 -463.94,-751.45 638.43,-751.45 -897.01,-672.71 -739.53,-672.71 -660.79,-672.71 -267.09,-672.71 -188.34,-672.71 -30.86,-672.71 47.88,-672.71 599.06,-672.71 -857.64,-593.97 -778.9,-593.97 -700.16,-593.97 -621.42,-593.97 -542.68,-593.97 -463.94,-593.97 717.17,-593.97 795.91,-593.97 874.65,-593.97 -897.01,-515.23 -818.27,-515.23 -739.53,-515.23 756.54,-515.23 835.28,-515.23 914.02,-515.23 -857.64,-436.49 -778.9,-436.49 717.17,-436.49 795.91,-436.49 874.65,-436.49 -897.01,-357.75 -818.27,-357.75 -739.53,-357.75 -582.05,-357.75 -503.31,-357.75 -424.57,-357.75 -345.83,-357.75 -267.09,-357.75 441.58,-357.75 520.32,-357.75 756.54,-357.75 835.28,-357.75 914.02,-357.75 -857.64,-279.01 -463.94,-279.01 -385.2,-279.01 -227.72,-279.01 -70.23,-279.01 87.25,-279.01 244.73,-279.01 323.47,-279.01 402.21,-279.01 480.95,-279.01 874.65,-279.01 -897.01,-200.27 -818.27,-200.27 -424.57,-200.27 -109.6,-200.27 205.36,-200.27 284.1,-200.27 441.58,-200.27 835.28,-200.27 914.02,-200.27 -463.94,-121.53 -385.2,-121.53 -306.46,-121.53 -227.72,-121.53 -148.97,-121.53 -70.23,-121.53 480.95,-121.53 874.65,-121.53
  other v2: -286.36,-813.17 -314.06,-812.39 -341.3,-807.27 -367.02,-796.94 -390.27,-781.85 -410.24,-762.63 -287.34,-741.95 -426.33,-740.06 -315.01,-740.36 -260.01,-737.34 -340.64,-729.8 -438.01,-714.93 -360.58,-710.55 -124.2,-709.19 -52.97,-699.44 -444.54,-687.99 -372.13,-685.35 -124.2,-681.47 -445.62,-660.29 -373.66,-657.68 -124.2,-653.76 -52.97,-644.01 -441.59,-632.87 -364.97,-631.36 -124.2,-626.04 -52.97,-616.29 -347.26,-610.05 -432.59,-606.65 -322.97,-596.69 -295.54,-592.7 -267.82,-592.7 -240.11,-592.7 -212.39,-592.7 -184.67,-592.7 -156.96,-592.7 -129.24,-592.7 -18.37,-592.7 9.34,-592.7 37.06,-592.7 64.78,-592.7 92.49,-592.7 120.21,-592.7 147.92,-592.7 258.79,-592.7 286.51,-592.7 314.22,-592.7 341.94,-592.7 369.66,-592.7 452.81,-592.7 480.52,-592.7 508.24,-592.7 535.96,-592.7 563.67,-592.7 591.33,-590.87 -52.97,-588.58 -418.83,-582.59 641.34,-567.98 -400.66,-561.67 660.89,-548.34 -597.15,-535.61 -569.43,-535.61 -541.72,-535.61 -514,-535.61 -486.28,-535.61 -458.57,-535.61 -430.85,-535.61 -403.13,-535.61 -375.42,-535.61 -624.83,-534.11 -354.11,-532.01 675.38,-524.71 -650.5,-523.67 -22.82,-521.47 4.9,-521.47 32.62,-521.47 60.33,-521.47 88.05,-521.47 198.91,-521.47 226.63,-521.47 254.35,-521.47 282.06,-521.47 309.78,-521.47 337.5,-521.47 365.21,-521.47 448.36,-521.47 476.08,-521.47 503.8,-521.47 531.51,-521.47 559.23,-521.47 586.74,-518.07 -65,-507.39 -670.52,-504.5 607.63,-499.86 683.53,-498.22 -82.68,-486.04 -682.63,-479.57 613.99,-472.88 -106.15,-471.3 685.22,-470.55 -604.26,-464.39 -576.55,-464.39 -548.83,-464.39 -521.11,-464.39 -493.4,-464.39 -465.68,-464.39 -437.96,-464.39 -410.25,-464.39 -382.53,-464.39 -354.82,-464.39 -327.1,-464.39 -299.38,-464.39 -271.67,-464.39 -243.95,-464.39 -216.23,-464.39 -188.52,-464.39 -160.8,-464.39 -133.09,-464.78 -685.22,-451.98 613.99,-445.17 685.22,-442.84 -613.99,-438.43 -685.22,-424.26 613.99,-417.45 685.22,-415.12 -613.99,-410.72 -685.22,-396.54 613.99,-389.73 685.22,-387.4 -613.99,-383 -685.22,-368.83 613.99,-362.02 685.22,-359.69 -613.99,-355.28 -685.22,-341.11 612.54,-334.34 687.46,-332.06 -613.99,-327.57 -688.44,-313.58 610.57,-306.69 688.64,-304.37 -609.34,-300.25 -688.95,-285.87 610.57,-278.98 688.64,-276.65 -609.07,-272.53 -689.22,-258.15 610.57,-251.26 688.64,-248.94 -609.08,-244.81 -684.41,-230.86 610.57,-223.54 688.64,-221.22 -622.45,-220.53
GNSS: J2.1 U1.42 | length 1627.5
  Top Layer w13.39: v3(-254.11,-777.56) U1.42
  Bottom Layer w13.39: v3(-254.11,-777.56) -300,-777.56 cw(c-300,-667.32) -300,-557.09 570.4,-557.09 ccw(c570.31,-477.79) 570.49,-557.09 ccw(c570.31,-477.79) 649.61,-478.52 J2.1
LED_G: D3.2 U1.45 | length 368.5
  Top Layer w10: D3.2@-590,-836.61 U1.45
LED_O: D2.2 U1.47 | length 504.5
  Top Layer w10: D2.2 D2.2@-706.61,-836.61 ; D2.2@-705.11,-836.61 D2.2@-706.61,-836.61 ; U1.47 -667.24,-875.98 D2.2@-706.61,-836.61
LED_R: D1.2 U1.48 | length 629.2
  Top Layer w10: D1.2 -767.17,-895.67 U1.48
LTE: J1.1 U1.35 | length 1013.6
  Top Layer w13.39: v3@-649.61,-251.18 v3(-649.61,-275.59) -649.61,-300 -649.61,-459.84 ccw(c-609.45,-459.84) -609.45,-500 -140,-500 cw(c-140,-551.42) -88.58,-551.42 U1.35
  other v3: -650,-300 -649.21,-251.18
NetBT1_P: BT1.P FS1.2 | length 90.6
  Top Layer w30: BT1.P FS1.2
NetC1_1: C1.1 R2.2 U1.10 | length 136.6
  Top Layer w10: U1.10 240.32,-954.72 260,-935.04 C1.1 R2.2
NetC4_2: C4.2 C5.2 C6.2 FB1.1 U1.14 | length 278.5
  Top Layer w15: U1.14 C4.2
  Top Layer w20: C4.2 C5.2 C6.2 FB1.1
NetC9_2: C9.2 C10.2 FB2.1 U1.65 | length 193.3
  Top Layer w15: C9.2 U1.65
  Top Layer w20: FB2.1 C10.2 C9.2
NetC15_2: C15.2 U1.24 | length 63.1
  Top Layer w15: U1.24 C15.2
NetD1_1: D1.1 R8.2 | length 48.1
  Top Layer w20: D1.1 R8.2
NetD2_1: D2.1 R1.2 | length 48.1
  Top Layer w20: D2.1 R1.2
NetD3_1: D3.1 R4.2 | length 48.5
  Top Layer w20: D3.1 -589.72,-728.23 R4.2
NetFS1_1: FS1.1 Q1.3 | length 140
  Top Layer w20: FS1.1 140,-63.39
NetJ6_C2: J6.C2 R3.2 | length 59.2
  Top Layer w10: J6.C2 R3.2
NetJ6_C3: J6.C3 R7.2 | length 59.2
  Top Layer w10: J6.C3 R7.2
NetJ6_C7: J6.C7 R5.1 | length 59.2
  Top Layer w10: J6.C7 R5.1
NetQ1_1: Q1.1 R10.1 | length 47.9
  Top Layer w10: R10.1 Q1.1
NetR6_1: R6.1 SW1.2 SW1.4 | length 269.7
  Top Layer w10: SW1.2 SW1.4 R6.1
RST: C3.2 J5.3 R6.2 U1.9 | length 2264.5
  Top Layer w7: v3(767.09,-940) 807.09,-900 807.09,-812.4 J5.3
  Top Layer w10: R6.2 v3(-410,-1710.63) ; U1.9 v3(260,-974.41) 260,-1004.09 C3.2@285.16,-1029.25 ; v3(767.09,-940) 747.09,-960 482.98,-960 368.26,-1074.72 328.66,-1074.72 294.92,-1040.98 C3.2 ; C3.2@285.16,-1029.25 294.92,-1039.02 C3.2 ; C3.2@285.16,-1029.25 C3.2
  Bottom Layer w10: v3(-410,-1710.63) 187.66,-1710.01 ccw(c187.56,-1680.01) 208.77,-1701.23 260,-1650 v3(260,-974.41)
SCL_I2C: U1.58
SDA_I2C: U1.59
SIM_CLK: R7.1 U1.18 | length 578.9
  Top Layer w10: U1.18 v3(255.91,-797.24) ; R7.1 v3(498.82,-1030)
  Bottom Layer w10: v3(255.91,-797.24) 225.58,-827.57 225.58,-852.43 243.15,-870 440,-870 498.82,-928.82 v3(498.82,-1030)
SIM_IO: R5.2 U1.17 | length 625.5
  Top Layer w10: v3(187.01,-816.93) U1.17 ; R5.2 v3(548.82,-1066.18)
  Bottom Layer w10: v3(187.01,-816.93) 187.01,-857.01 230,-900 440,-900 470,-930 470,-1046.18 490,-1066.18 v3(548.82,-1066.18)
SIM_RST: R3.1 U1.16 | length 564.8
  Top Layer w10: U1.16@221.56,-836.71 v3(256,-836.71) ; v3(548.82,-1030) 580,-1030 598.82,-1048.82 R3.1
  Top Layer w13.39: U1.16 U1.16@221.65,-836.81
  Bottom Layer w10: v3(256,-836.71) 436.71,-836.71 548.82,-948.82 v3(548.82,-1030)
SIM_VDD: C2.2 J6.C1 U1.19 | length 828.3
  Top Layer w10: v3(187.01,-777.56) U1.19 ; v3(648.82,-1140) C2.2
  Top Layer w13.39: J6.C1 C2.2
  Bottom Layer w10: v3(187.01,-777.56) 189.13,-775.43 405.43,-775.43 648.82,-1018.82 v3(648.82,-1140)
SW: J3.2 U1.12 | length 1126
  Top Layer w10: v3(187.01,-915.35) U1.12 ; v3(354.33,-78.74) 354.33,-304.33 410,-360 v3(410,-640)
  Bottom Layer w10: v3(187.01,-915.35) 187.01,-911.67 160,-884.66 160,-690 210,-640 v3(410,-640)
SWDCLK: J5.4 U1.3 | length 949.9
  Top Layer w10: U1.3 223.35,-1094.41 290,-1094.41 307.8,-1112.2 380.32,-1112.2 492.52,-1000 787.09,-1000 v3(847.09,-940) ; J5.4 v3(857.09,-762.4)
  Bottom Layer w5: v3(847.09,-940) 813.67,-906.58 813.67,-805.82 v3(857.09,-762.4)
SWDIO: J5.2 U1.4 | length 875.3
  Top Layer w10: U1.4 223.35,-1074.72 295.16,-1074.72 314.84,-1094.41 374.41,-1094.41 488.82,-980 767.09,-980 v3(807.09,-940) ; v3(807.09,-762.4) J5.2
  Bottom Layer w5: v3(807.09,-940) cw(c824.2,-922.89) 800,-922.89 800,-779.51 cw(c824.2,-779.51) v3(807.09,-762.4)
TMR: S1.2 U1.80 | length 783.8
  Top Layer w10: S1.2 187.01,-1732.83 U1.80
Vbat: C11.2 C12.2 C13.2 C14.2 FB1.2 Q1.2 U2.1 U2.3 | length 1131.9
  Top Layer w30: U2.1 C14.2 ; U2.3 C12.2 ; C12.2@126.34,-359.65 C12.2 ; Q1.2 157.4,-144.09 126.22,-175.28 126.22,-289.76 C13.2 C12.2 ; FB1.2 C11.2 304.41,-687.87 126.46,-509.92 126.46,-435.04 C14.2 ; C12.2 126.22,-360.24 C14.2
pads on no net: BT1. J5. J5.6 J6.C6 J6.CD J6.NPTH1 J6.NPTH2 J6.Shell U1.2 U1.5 U1.6 U1.8 U1.11 U1.21 U1.22 U1.23 U1.26 U1.27 U1.28 U1.29 U1.31 U1.32 U1.33 U1.37 U1.44 U1.49 U1.50 U1.52 U1.53 U1.54 U1.56 U1.57 U1.61 U1.62 U1.63 U1.64 U1.67 U1.68 U1.69 U1.70 U1.72 U1.73 U1.74 U1.75 U1.77 U1.78 U1.79 U2.4

## Polygon pours and split planes (outlines as drawn)
GND on Bottom Layer "NONET_L-01_P-001" (solid, pour order 1): -984.25,0 984.25,0 984.25,-1968.5 -984.25,-1968.5
GND on Top Layer "NONET_L-01_P-001" (solid, pour order 0): -984.25,0 984.25,0 984.25,-1968.5 -984.25,-1968.5
GND on Mid Layer 2 (split plane): 964.16,-1850.39 964.16,-1856.82 962.48,-1869.56 959.15,-1881.97 954.24,-1893.84 947.81,-1904.96 939.99,-1915.16 930.9,-1924.24 920.71,-1932.06 909.58,-1938.49 897.71,-1943.4 885.3,-1946.73 872.57,-1948.41 866.14,-1948.41 -866.14,-1948.41 -872.57,-1948.41 -885.3,-1946.73 -897.71,-1943.4 -909.59,-1938.49 -920.71,-1932.06 -930.9,-1924.24 -939.99,-1915.16 -947.81,-1904.96 -954.24,-1893.84 -959.15,-1881.97 -962.48,-1869.56 -964.15,-1856.82 -964.16,-1850.39 -964.16,-20.1 -752.38,-20.1 -752.38,-200 -751.99,-203.92 -750.85,-207.69 -748.99,-211.17 -746.49,-214.21 -743.45,-216.71 -739.97,-218.57 -736.2,-219.71 -732.28,-220.1 -566.93,-220.1 -563.01,-219.71 -559.24,-218.57 -555.76,-216.71 -552.72,-214.21 -550.22,-211.17 -548.36,-207.69 -547.22,-203.92 -546.83,-200 -546.83,-20.1 546.83,-20.1 546.83,-200 547.22,-203.92 548.36,-207.69 550.22,-211.17 552.72,-214.21 555.76,-216.71 559.24,-218.57 563.01,-219.71 566.93,-220.1 732.28,-220.1 736.2,-219.71 739.97,-218.57 743.45,-216.71 746.49,-214.21 748.99,-211.17 750.85,-207.69 751.99,-203.92 752.38,-200 752.38,-20.1 964.16,-20.1
3Vcc on Mid Layer 1 (split plane): 156 vertices, not listed, extent -964.16,-1948.41 964.16,-20.1
GND on Mid Layer 1 (split plane): -189.93,-290 -189.93,-290.02 -189.59,-299.32 -188.6,-308.59 -186.94,-317.77 -184.63,-326.8 -181.69,-335.65 -178.12,-344.27 -173.95,-352.61 -169.19,-360.63 -163.87,-368.29 -158.02,-375.55 -151.68,-382.36 -151.66,-382.37 -37.48,-496.56 -37.15,-496.82 -31.52,-502.91 -26.13,-509.74 -21.29,-516.98 -17.04,-524.57 -13.4,-532.48 -10.38,-540.64 -8.02,-549.02 -6.32,-557.56 -5.3,-566.2 -4.97,-574.49 -5.03,-574.9 -5.03,-755.75 -4.97,-756.15 -5.3,-764.32 -6.3,-772.84 -7.98,-781.26 -10.31,-789.52 -13.28,-797.57 -16.87,-805.36 -21.06,-812.85 -25.83,-819.99 -31.15,-826.73 -36.7,-832.73 -37.02,-832.98 -37.28,-833.31 -42.92,-838.49 -49.33,-843.4 -56.14,-847.74 -63.3,-851.47 -70.76,-854.56 -78.47,-856.99 -86.35,-858.74 -94.36,-859.79 -102.01,-860.13 -102.43,-860.07 -374.13,-860.07 -374.54,-860.13 -382.83,-859.8 -391.47,-858.78 -400.01,-857.08 -408.39,-854.72 -416.55,-851.7 -424.46,-848.06 -432.05,-843.81 -439.29,-838.97 -446.12,-833.58 -452.21,-827.95 -452.47,-827.62 -456.92,-823.18 -457.27,-822.9 -462.19,-817.48 -466.82,-811.24 -470.81,-804.58 -474.13,-797.56 -476.74,-790.24 -478.63,-782.71 -479.77,-775.03 -480.13,-767.71 -480.07,-767.27 -480.07,-750 -480.06,-750 -480.45,-739.99 -481.63,-730.05 -483.58,-720.23 -486.3,-710.59 -489.77,-701.2 -493.96,-692.1 -498.85,-683.37 -504.41,-675.04 -510.61,-667.18 -517.41,-659.82 -517.42,-659.83 -528.92,-648.34 -528.93,-648.32 -535.75,-641.98 -543.01,-636.13 -550.67,-630.81 -558.69,-626.05 -567.03,-621.88 -575.64,-618.31 -584.49,-615.37 -593.53,-613.06 -602.7,-611.4 -611.97,-610.41 -621.28,-610.07 -621.29,-610.07 -964.16,-610.07 -964.16,-20.1 -752.38,-20.1 -752.38,-200 -751.99,-203.92 -750.85,-207.69 -748.99,-211.17 -746.49,-214.21 -743.45,-216.71 -739.97,-218.57 -736.2,-219.71 -732.28,-220.1 -566.93,-220.1 -563.01,-219.71 -559.24,-218.57 -555.76,-216.71 -552.72,-214.21 -550.22,-211.17 -548.36,-207.69 -547.22,-203.92 -546.83,-200 -546.83,-20.1 -189.93,-20.1

## Keep-outs
Keep-Out Layer:
  the board outline again, w10

## Other copper
Bottom Layer:
  region net GND: 559.61,-5 514.61,-5 514.61,-300 590.28,-300 ccw(c590.28,-299.62) 590.55,-299.88 590.55,-210 559.61,-210
  region net GND: 739.61,-5 784.61,-5 784.61,-300 708.94,-300 cw(c708.94,-299.62) 708.66,-299.88 708.66,-210 739.61,-210
  region net GND: -739.61,-5 -784.61,-5 -784.61,-300 -708.94,-300 ccw(c-708.94,-299.62) -708.66,-299.88 -708.66,-210 -739.61,-210
  region net GND: -559.61,-5 -514.61,-5 -514.61,-300 -590.28,-300 cw(c-590.28,-299.62) -590.55,-299.88 -590.55,-210 -559.61,-210
Mid Layer 1 (plane layer: these items are gaps in the copper):
  lines w19.68: -990,-620 -621.29,-620 cw(c-621.29,-740.71) -535.94,-655.36 -524.44,-666.85 cw(c-607.59,-750) -490,-750 -490,-767.27 ccw(c-401.01,-767.27) -463.94,-830.19 -459.49,-834.64 ccw(c-374.13,-749.29) -374.13,-870 -102.43,-870 ccw(c-102.43,-767.57) -30,-840 ccw(c-114.25,-755.75) 4.9,-755.75 4.9,-574.9 ccw(c-115.81,-574.9) -30.46,-489.54 -144.64,-375.36 cw(c-59.29,-290) -180,-290 -180,0

## Silkscreen, mask and mechanical layers (free items; w line width, h text height)
Top Overlay:
  drawing of 40 lines, arcs and shapes, not listed
  text "PiggySat" at -417.85,-90 h30
  text "LTE" at -865,-295 h60
  text "GNSS" at 715,-295 h60
  text "LTE" at -677.05,-1155 h60 r90
  text "GNSS" at -797.05,-1215 h60 r90
  text "SENT" at -557.05,-1215 h60 r90
  text "SAFE" at -105,-1615 h60
  text "RST" at -855,-1775 h60
  text "SIM" at 445,-1885 h60
Assembly Notes:
  drawing of 295 lines, arcs and shapes, not listed
  text "Layer" at 1145.04,-45 h30
  text "Name" at 1360,-45 h30
  text "Material" at 1834.87,-45 h30
  text "Thickness" at 2274.76,-45 h30
  text "Constant" at 2609.67,-45 h30
  text "Board Layer Stack" at 2904.6,-45 h30
  text "Top Overlay" at 1360,-105 h30
  text "Top Solder" at 1360,-165 h30
  text "Solder Resist" at 1834.87,-165 h30
  text "0.50mil" at 2274.76,-165 h30
  text "3.8" at 2609.67,-165 h30
  text "1" at 1145.04,-225 h30
  text "Top Layer" at 1360,-225 h30
  text "1.38mil" at 2274.76,-225 h30
  text "Dielectric 1" at 1360,-285 h30
  text "7628" at 1834.87,-285 h30
  text "8.28mil" at 2274.76,-285 h30
  text "4.4" at 2609.67,-285 h30
  text "2" at 1145.04,-345 h30
  text "Mid Layer 1" at 1360,-345 h30
  text "0.60mil" at 2274.76,-345 h30
  text "Core" at 1360,-405 h30
  text "FR-4" at 1834.87,-405 h30
  text "41.93mil" at 2274.76,-405 h30
  text "4.6" at 2609.67,-405 h30
  text "3" at 1145.04,-465 h30
  text "Mid Layer 2" at 1360,-465 h30
  text "0.60mil" at 2274.76,-465 h30
  text "Dielectric 2" at 1360,-525 h30
  text "7628" at 1834.87,-525 h30
  text "8.28mil" at 2274.76,-525 h30
  text "4.4" at 2609.67,-525 h30
  text "4" at 1145.04,-585 h30
  text "Bottom Layer" at 1360,-585 h30
  text "1.38mil" at 2274.76,-585 h30
  text "Bottom Solder" at 1360,-645 h30
  text "Solder Resist" at 1834.87,-645 h30
  text "0.50mil" at 2274.76,-645 h30
  text "3.8" at 2609.67,-645 h30
  text "Bottom Overlay" at 1360,-705 h30

## Text inside footprints (layer, text, board x,y; h text height)
BT1: Bottom Overlay "+" at -150,-723.62 h300 r270
J3: Bottom Overlay "1" at 464.33,55 h30; Bottom Overlay "3" at 254.33,55 h30